# EAGLE board combined (EAGLE 9.6.2)
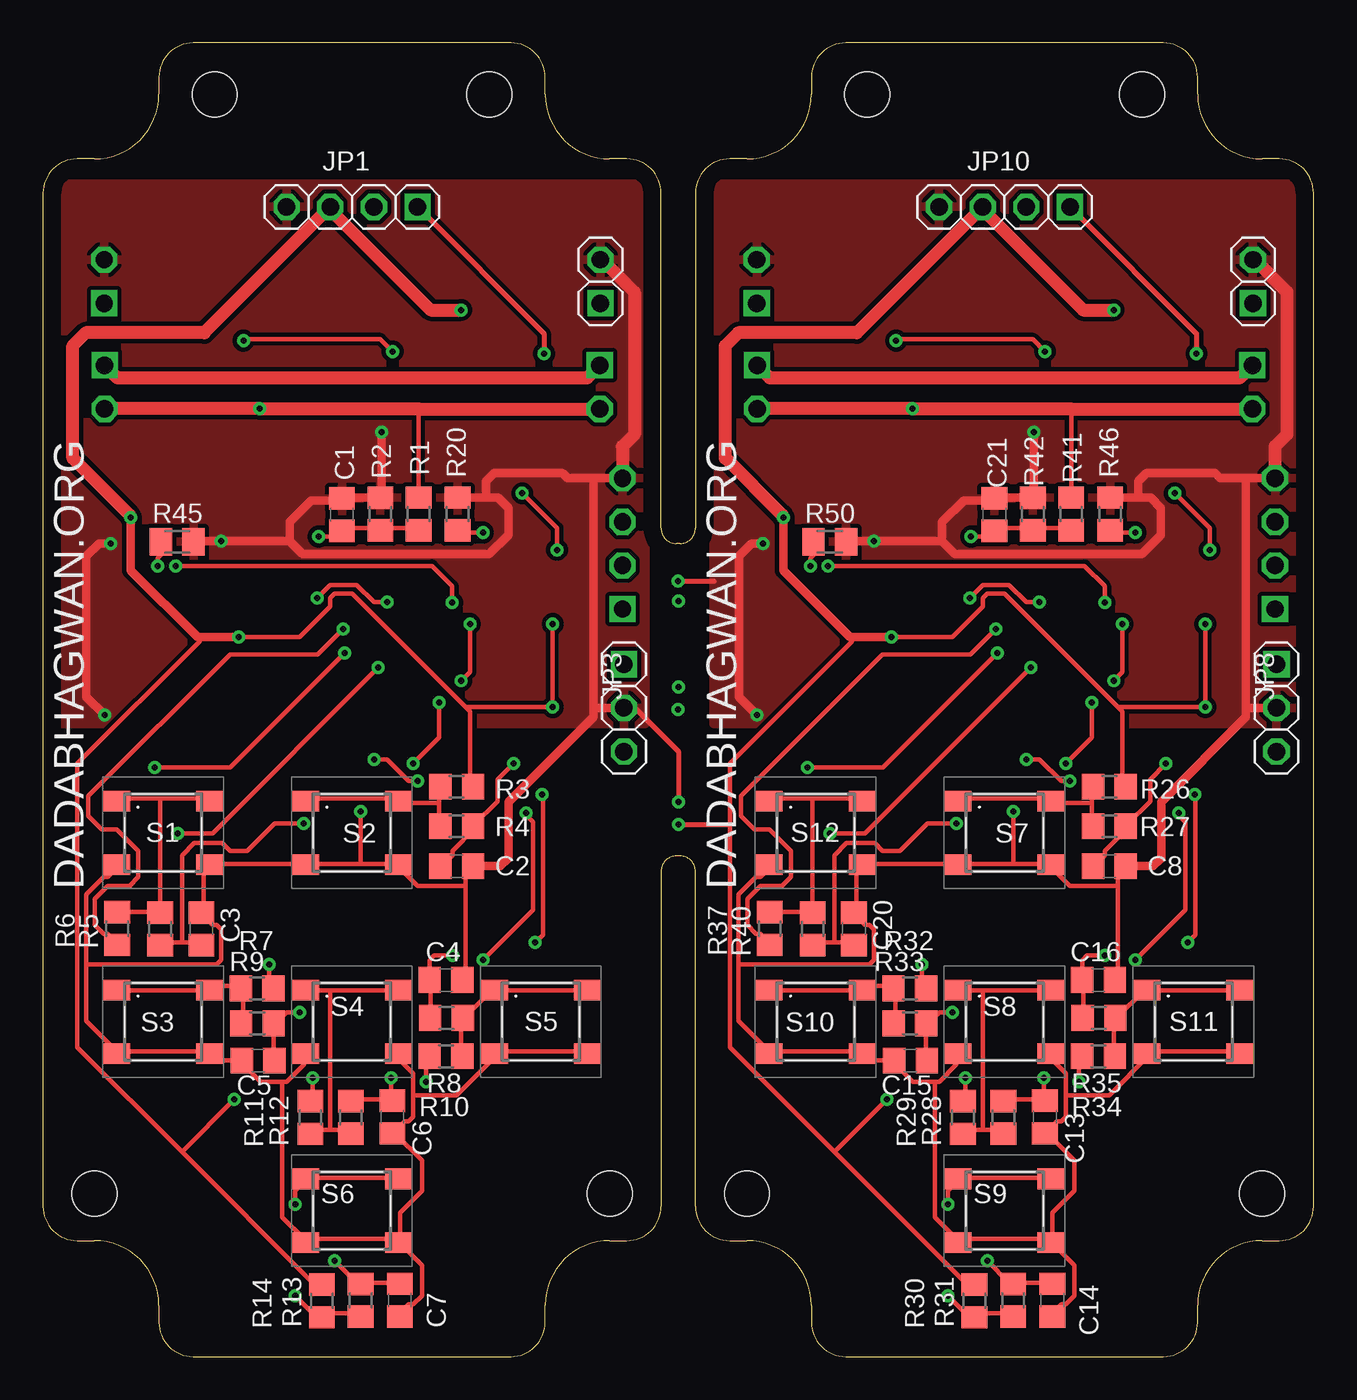
[diagram p0: board, top side]
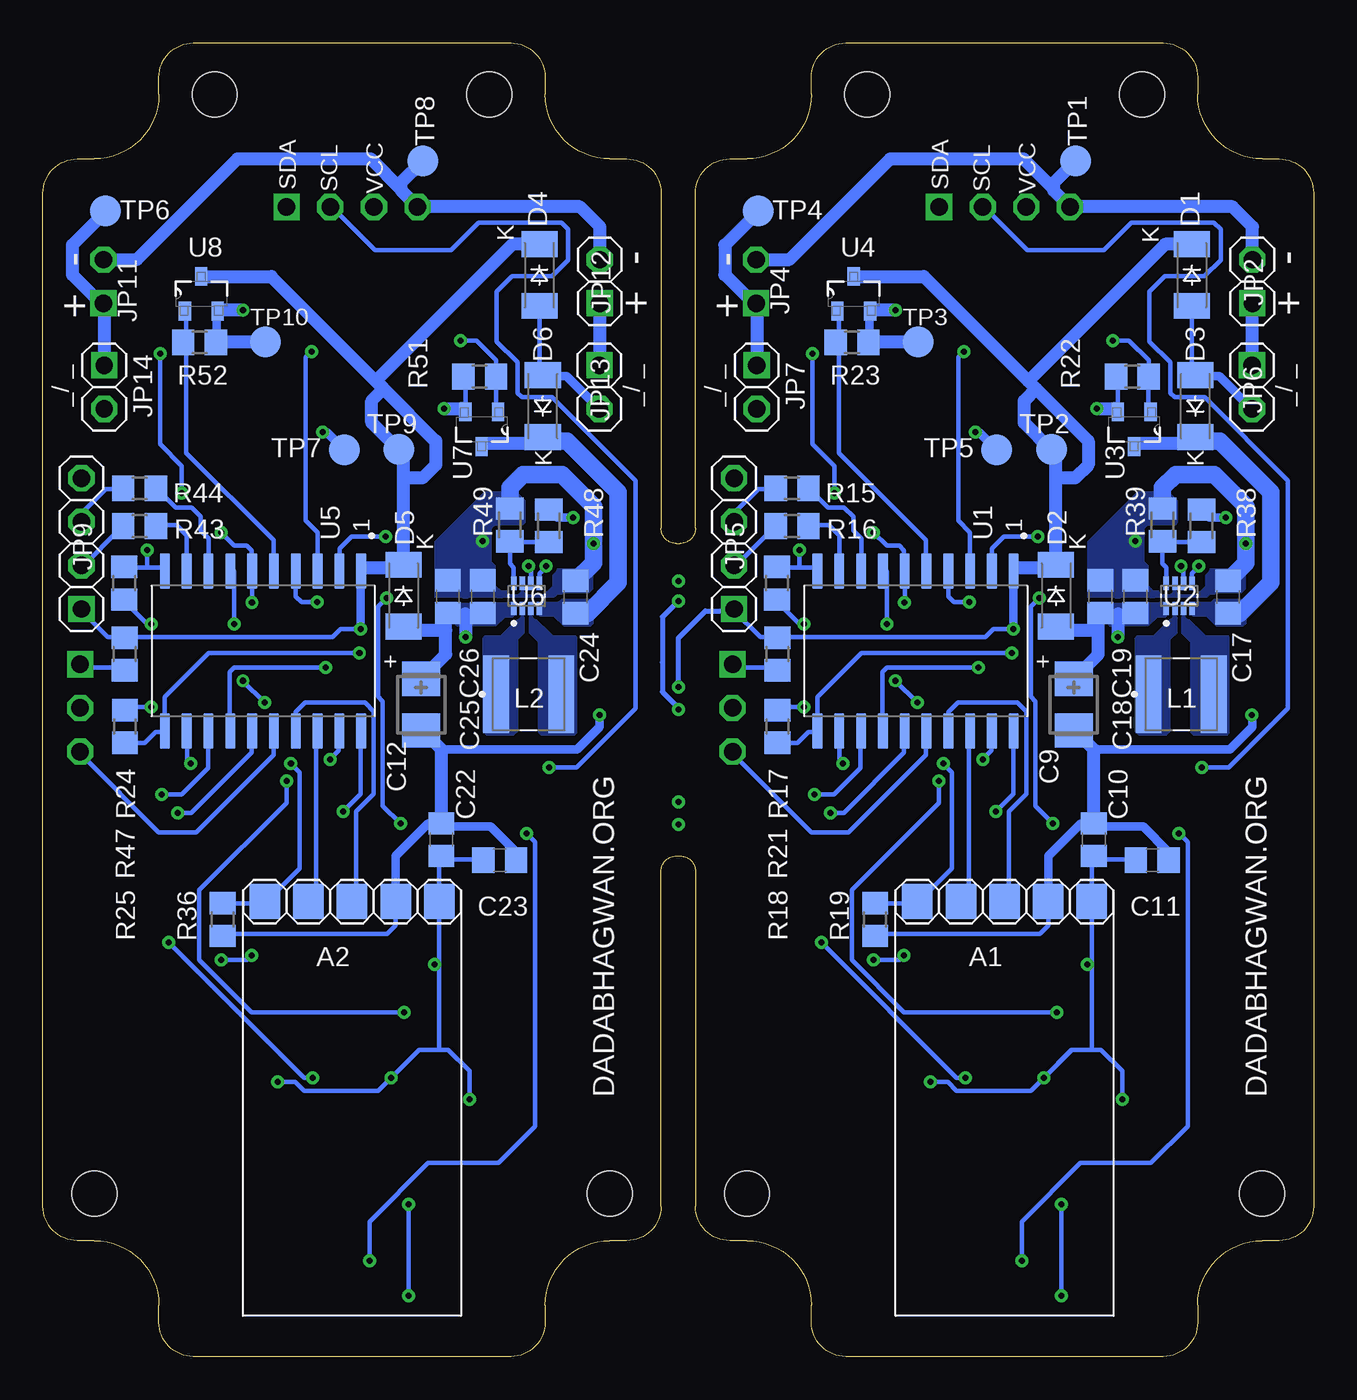
[diagram p1: board, bottom side, seen from below]

Size 74 x 76.5 mm. Coordinates in mm from the lower left corner, seen from the top.
Outline: 37.1,29.15 36.9,29.15 arc90 36,28.25 36,8.75 arc-90 34,6.75 33,6.75 arc90 29.25,3 29.25,2 arc-90 27.25,0 8.75,0 arc-90 6.75,2 6.75,3 arc90 3,6.75 2,6.75 arc-90 0,8.75 0,67.75 arc-90 2,69.75 3,69.75 arc90 6.75,73.5 6.75,74.5 arc-90 8.75,76.5 27.25,76.5 arc-90 29.25,74.5 29.25,73.5 arc90 33,69.75 34,69.75 arc-90 36,67.75 36,48.25 arc90 36.9,47.35 37.1,47.35 arc90 38,48.25 38,67.75 arc-90 40,69.75 41,69.75 arc90 44.75,73.5 44.75,74.5 arc-90 46.75,76.5 65.25,76.5 arc-90 67.25,74.5 67.25,73.5 arc90 71,69.75 72,69.75 arc-90 74,67.75 74,8.75 arc-90 72,6.75 71,6.75 arc90 67.25,3 67.25,2 arc-90 65.25,0 46.75,0 arc-90 44.75,2 44.75,3 arc90 41,6.75 40,6.75 arc-90 38,8.75 38,28.25 arc90 37.1,29.15
Copper layers (1*16): Top 0.035mm / dielectric 1.5mm / Bottom 0.035mm
Design rules "default *": minimum track width 8mil, minimum drill 0.35mm, track to track 8mil, track to pad 8mil, pad to pad 8mil, via to via 8mil, smd to smd 6mil, copper to edge 40mil, drill to drill 6mil, minimum pad ring 10mil, minimum via ring 8mil, stop-mask expansion 4mil, vias tented up to drill 15mil, thermal gap 10mil
Net classes: 0 default: width 0.254 mm, clearance 0.254 mm
Holes 2.6 mm at 3,9.5 33,9.5 41,9.5 71,9.5 10,73.5 26,73.5 48,73.5 64,73.5

## Footprints (pad centres in the part's own frame; a part is rotated, then mirrored left to right if it is on the bottom)
1X05X254 = smd 1.778 x 2.032: 1 -5.08,0; 2 -2.54,0; 3 0,0; 4 2.54,0; 5 5.08,0
C0805 = smd 1.3 x 1.5: 1 -0.95,0; 2 0.95,0
CT3528 = smd 2 x 2.2: + -1.5,0; - 1.5,0
SOD-123_MINI-SMA = smd 1.5 x 2.1: A 1.8,0; C -1.8,0
1X04-S = drill 1.016 square: 1 -3.81,0 | drill 1.016 octagon: 2 -1.27,0; 3 1.27,0; 4 3.81,0
1X02-S = drill 1.016 square: 1 -1.27,0 | drill 1.016 octagon: 2 1.27,0
1X03-S = drill 1.016 square: 1 -2.54,0 | drill 1.016 octagon: 2 0,0; 3 2.54,0
IND_74404043220A = smd 1.5 x 4.5: 1 -1.9,0; 2 1.9,0
R0805 = smd 1.3 x 1.5: 1 -0.95,0; 2 0.95,0
M0805 = smd 1.3 x 1.6: 1 -0.95,0; 2 0.95,0
SW_55MM = smd 1.55 x 1.2: 1 -2.7,1.85; 2 2.7,1.85; 3 -2.7,-1.85; 4 2.7,-1.85
TP18R = smd 1.8 x 1.8: TP 0,0
SOIC127P1032X265-20N = smd 2.05 x 0.6: 1 -4.655,5.715; 2 -4.655,4.445; 3 -4.655,3.175; 4 -4.655,1.905; 5 -4.655,0.635; 6 -4.655,-0.635; 7 -4.655,-1.905; 8 -4.655,-3.175; 9 -4.655,-4.445; 10 -4.655,-5.715; 11 4.655,-5.715; 12 4.655,-4.445; 13 4.655,-3.175; 14 4.655,-1.905; 15 4.655,-0.635; 16 4.655,0.635; 17 4.655,1.905; 18 4.655,3.175; 19 4.655,4.445; 20 4.655,5.715
SOTFL50P160X60-8N = smd 0.768 x 0.32: 1 -0.737,0.75; 2 -0.737,0.25; 3 -0.737,-0.25; 4 -0.737,-0.75; 5 0.737,-0.75; 6 0.737,-0.25; 7 0.737,0.25; 8 0.737,0.75
SOT103P240X110-3N = smd 1.1 x 0.711: 1 -1.016,0.95; 2 -1.016,-0.95; 3 1.016,0

## Placement (x,y rotation side)
A1  1X05  [1X05X254]  18,26.5 180 bottom
A2  1X05  [1X05X254]  56,26.5 180 bottom
C1  100nF  [C0805]  17.41,49.03 90 top
C2  100nF  [C0805]  24.1,28.56 0 top
C3  100nF  [C0805]  9.23,24.9 90 top
C4  100nF  [C0805]  23.47,21.93 0 top
C5  100nF  [C0805]  12.53,17.24 180 top
C6  100nF  [C0805]  20.35,13.95 270 top
C7  100nF  [C0805]  20.78,3.29 270 top
C8  100nF  [C0805]  62.1,28.56 0 top
C9  10uF  [CT3528]  13.97,37.96 270 bottom
C10  10uF  [C0805]  12.8,30.1 90 bottom
C11  10uF  [C0805]  9.4,28.9 0 bottom
C12  10uF  [CT3528]  51.97,37.96 270 bottom
C13  100nF  [C0805]  58.35,13.95 270 top
C14  100nF  [C0805]  58.78,3.29 270 top
C15  100nF  [C0805]  50.53,17.24 180 top
C16  100nF  [C0805]  61.47,21.93 0 top
C17  10uF  [C0805]  4.98,44.23 90 bottom
C18  10uF  [C0805]  10.38,44.25 90 bottom
C19  10uF  [C0805]  12.42,44.25 90 bottom
C20  100nF  [C0805]  47.23,24.9 90 top
C21  100nF  [C0805]  55.41,49.03 90 top
C22  10uF  [C0805]  50.8,30.1 90 bottom
C23  10uF  [C0805]  47.4,28.9 0 bottom
C24  10uF  [C0805]  42.98,44.23 90 bottom
C25  10uF  [C0805]  48.38,44.25 90 bottom
C26  10uF  [C0805]  50.42,44.25 90 bottom
D1  BAT  [SOD-123_MINI-SMA]  7.09,62.98 270 bottom
D2  BAT  [SOD-123_MINI-SMA]  15,44.31 270 bottom
D3  BAT  [SOD-123_MINI-SMA]  6.89,55.35 90 bottom
D4  BAT  [SOD-123_MINI-SMA]  45.09,62.98 270 bottom
D5  BAT  [SOD-123_MINI-SMA]  53,44.31 270 bottom
D6  BAT  [SOD-123_MINI-SMA]  44.89,55.35 90 bottom
JP1  [1X04-S]  18,66.95 180 top
JP2  [1X02-S]  3.57,62.61 90 bottom
JP3  [1X03-S]  33.84,37.77 270 top
JP4  [1X02-S]  32.47,62.61 90 top
JP5  [1X04-S]  33.75,47.34 90 bottom
JP6  [1X02-S]  3.59,56.46 270 bottom
JP7  [1X02-S]  32.43,56.46 270 bottom
JP8  [1X03-S]  71.84,37.77 270 top
JP9  [1X04-S]  71.75,47.34 90 bottom
JP10  [1X04-S]  56,66.95 180 top
JP11  [1X02-S]  70.47,62.61 90 top
JP12  [1X02-S]  41.57,62.61 90 bottom
JP13  [1X02-S]  41.59,56.46 270 bottom
JP14  [1X02-S]  70.43,56.46 270 bottom
L1  1uH  [IND_74404043220A]  7.71,38.57 0 bottom
L2  1uH  [IND_74404043220A]  45.71,38.57 0 bottom
R1  100K  [R0805]  21.88,49.07 90 top
R2  100K  [R0805]  19.65,49.06 90 top
R3  10K  [R0805]  24.1,33.19 0 top
R4  10K  [R0805]  24.1,30.89 180 top
R5  10K  [R0805]  6.83,24.9 90 top
R6  10K  [R0805]  4.32,24.92 270 top
R7  10K  [R0805]  12.48,21.44 0 top
R8  10K  [R0805]  23.5,19.72 0 top
R9  10K  [R0805]  12.49,19.4 180 top
R10  10K  [R0805]  23.47,17.49 180 top
R11  10K  [R0805]  17.93,13.93 270 top
R12  10K  [R0805]  15.58,13.92 90 top
R13  10K  [R0805]  18.5,3.28 270 top
R14  10K  [R0805]  16.25,3.24 90 top
R15  1K  [R0805]  30.37,50.56 0 bottom
R16  1K  [R0805]  30.37,48.36 0 bottom
R17  30K  [R0805]  31.26,45.04 90 bottom
R18  30K  [R0805]  31.22,36.69 270 bottom
R19  30K  [R0805]  25.54,25.45 90 bottom
R20  30K  [R0805]  24.15,49.07 270 top
R21  200E  [R0805]  31.23,40.91 270 bottom
R22  100K  [R0805]  10.56,57.06 180 bottom
R23  100K  [R0805]  26.88,59.06 180 bottom
R24  30K  [R0805]  69.26,45.04 90 bottom
R25  30K  [R0805]  69.22,36.69 270 bottom
R26  10K  [R0805]  62.1,33.19 0 top
R27  10K  [R0805]  62.1,30.89 180 top
R28  10K  [R0805]  53.58,13.92 90 top
R29  10K  [R0805]  55.93,13.93 270 top
R30  10K  [R0805]  54.25,3.24 90 top
R31  10K  [R0805]  56.5,3.28 270 top
R32  10K  [R0805]  50.48,21.44 0 top
R33  10K  [R0805]  50.49,19.4 180 top
R34  10K  [R0805]  61.47,17.49 180 top
R35  10K  [R0805]  61.5,19.72 0 top
R36  30K  [R0805]  63.54,25.45 90 bottom
R37  10K  [R0805]  42.32,24.92 270 top
R38  511K  [M0805]  6.54,48.38 90 bottom
R39  91K  [M0805]  8.81,48.43 270 bottom
R40  10K  [R0805]  44.83,24.9 90 top
R41  100K  [R0805]  59.88,49.07 90 top
R42  100K  [R0805]  57.65,49.06 90 top
R43  1K  [R0805]  68.37,48.36 0 bottom
R44  1K  [R0805]  68.37,50.56 0 bottom
R45  50K  [M0805]  7.82,47.45 180 top
R46  30K  [R0805]  62.15,49.07 270 top
R47  200E  [R0805]  69.23,40.91 270 bottom
R48  511K  [M0805]  44.54,48.38 90 bottom
R49  91K  [M0805]  46.81,48.43 270 bottom
R50  50K  [M0805]  45.82,47.45 180 top
R51  100K  [R0805]  48.56,57.06 180 bottom
R52  100K  [R0805]  64.88,59.06 180 bottom
S1  SW  [SW_55MM]  7,30.5 0 top
S2  SW  [SW_55MM]  18,30.5 0 top
S3  SW  [SW_55MM]  7,19.5 0 top
S4  SW  [SW_55MM]  18,19.5 0 top
S5  SW  [SW_55MM]  29,19.5 0 top
S6  SW  [SW_55MM]  18,8.5 0 top
S7  SW  [SW_55MM]  56,30.5 0 top
S8  SW  [SW_55MM]  56,19.5 0 top
S9  SW  [SW_55MM]  56,8.5 0 top
S10  SW  [SW_55MM]  45,19.5 0 top
S11  SW  [SW_55MM]  67,19.5 0 top
S12  SW  [SW_55MM]  45,30.5 0 top
TP1  GND  [TP18R]  13.87,69.62 0 bottom
TP2  VDD  [TP18R]  15.26,52.82 270 bottom
TP3  VCC  [TP18R]  23.04,59.08 0 bottom
TP4  VBAT  [TP18R]  32.35,66.73 180 bottom
TP5  GND  [TP18R]  18.45,52.79 0 bottom
TP6  VBAT  [TP18R]  70.35,66.73 180 bottom
TP7  GND  [TP18R]  56.45,52.79 0 bottom
TP8  GND  [TP18R]  51.87,69.62 0 bottom
TP9  VDD  [TP18R]  53.26,52.82 270 bottom
TP10  VCC  [TP18R]  61.04,59.08 0 bottom
U1  1  [SOIC127P1032X265-20N]  23.18,41.09 270 bottom
U2  TPS  [SOTFL50P160X60-8N]  7.83,44.3 90 bottom
U3  PMOS  [SOT103P240X110-3N]  10.45,54 270 bottom
U4  PMOS  [SOT103P240X110-3N]  26.78,61.89 90 bottom
U5  1  [SOIC127P1032X265-20N]  61.18,41.09 270 bottom
U6  TPS  [SOTFL50P160X60-8N]  45.83,44.3 90 bottom
U7  PMOS  [SOT103P240X110-3N]  48.45,54 270 bottom
U8  PMOS  [SOT103P240X110-3N]  64.78,61.89 90 bottom

## Library data of the parts
A1 A2 = pinhead_smd
C1-C26 = rcl; SPICEPREFIX: C
D1-D6 = diode
JP1-JP14 = pinhead-2
L1 L2 = 5040_INDUCTOR; AVAILABILITY: In Stock; CHECK_PRICES: https://www.snapeda.com/parts/74404043220A/Wurth+Electronics+Inc./view-part/?ref=eda; DESCRIPTION: 22 µH Semi-Shielded Wirewound Inductor 1.11 A 200mOhm Nonstandard; MF: Wurth Electronics; MP: 74404043220A; PACKAGE: Nonstandard Würth Elektronik; PRICE: None; PURCHASE-URL: https://www.snapeda.com/api/url_track_click_mouser/?unipart_id=703901&manufacturer=Wurth Electronics&part_name=74404043220A&search_term=744040; SNAPEDA_LINK: https://www.snapeda.com/parts/74404043220A/Wurth+Electronics+Inc./view-part/?ref=snap
R1-R52 = rcl; SPICEPREFIX: R
S1-S12 = switch_5p5mm; AVAILABILITY: In Stock; CHECK_PRICES: https://www.snapeda.com/parts/PTS%20647%20SK38%20SMTR2%20LFS/C%2526K/view-part/?ref=eda; DESCRIPTION: Tactile Switch SPST-NO Top Actuated Surface Mount; MF: C&K; MP: PTS 647 SK38 SMTR2 LFS; PACKAGE: None; PRICE: None; PURCHASE-URL: https://www.snapeda.com/api/url_track_click_mouser/?unipart_id=4834952&manufacturer=C&amp;K&part_name=PTS 647 SK38 SMTR2 LFS&search_term=pts647; SNAPEDA_LINK: https://www.snapeda.com/parts/PTS%20647%20SK38%20SMTR2%20LFS/C%2526K/view-part/?ref=snap
TP1-TP10 = testpad
U1 U5 = ATTINY1616-SNR; AVAILABILITY: In Stock; DESCRIPTION: AVR tinyAVR™ 1, Functional Safety (FuSa) Microcontroller IC 8-Bit 20MHz 16KB (16K x 8) FLASH 20-SOIC; MF: Microchip Technology; MP: ATTINY1616-SNR; PACKAGE: SOIC-20 Microchip; PRICE: None; PURCHASE-URL: https://pricing.snapeda.com/search/part/ATTINY1616-SNR/?ref=eda
U2 U6 = TPS63000DRLR; AVAILABILITY: In Stock; CHECK_PRICES: https://www.snapeda.com/parts/TPS563212DRLR/Texas+Instruments/view-part/?ref=eda; DESCRIPTION: 4.2-V to 18-V, 3-A, 1.2-MHz, synchronous buck converter with eco-mode and selectable FCCM; MF: Texas Instruments; MP: TPS563212DRLR; PACKAGE: SOT-583 Texas Instruments; PRICE: None; PURCHASE-URL: https://www.snapeda.com/api/url_track_click_mouser/?unipart_id=9593796&manufacturer=Texas Instruments&part_name=TPS563212DRLR&search_term=sot-583; SNAPEDA_LINK: https://www.snapeda.com/parts/TPS563212DRLR/Texas+Instruments/view-part/?ref=snap
U3 U4 U7 U8 = DMP3165L; AVAILABILITY: In Stock; CHECK_PRICES: https://www.snapeda.com/parts/DMP3130L-7/Diodes+Inc./view-part/?ref=eda; DESCRIPTION: P-Channel 30 V 3.5A (Ta) 700mW (Ta) Surface Mount SOT-23-3; MF: Diodes Inc.; MP: DMP3130L-7; PACKAGE: SOT-23 Diodes Inc.; PRICE: None; PURCHASE-URL: https://pricing.snapeda.com/search?q=DMP3130L-7&ref=eda; SNAPEDA_LINK: https://www.snapeda.com/parts/DMP3130L-7/Diodes+Inc./view-part/?ref=snap

## Nets
DC_SW: R22.1 U1.3 U3.1
DC_SW1: R51.1 U5.3 U7.1
GND: A1.2 C1.2 C2.2 C3.2 C4.2 C5.2 C6.2 C7.2 C9.- C10.2 C11.2 C17.2 C18.2 C19.2 JP1.4 JP2.2 JP3.2 JP4.2 JP5.4 R2.2 R19.1 R20.1 R39.1 R45.1 S1.3 S1.4 S2.3 S2.4 S3.3 S3.4 S4.3 S4.4 S5.3 S5.4 S6.3 S6.4 TP1.TP TP5.TP U1.20 U2.7
GND1: A2.2 C8.2 C12.- C13.2 C14.2 C15.2 C16.2 C20.2 C21.2 C22.2 C23.2 C24.2 C25.2 C26.2 JP8.2 JP9.4 JP10.4 JP11.2 JP12.2 R36.1 R42.2 R46.1 R49.1 R50.1 S7.3 S7.4 S8.3 S8.4 S9.3 S9.4 S10.3 S10.4 S11.3 S11.4 S12.3 S12.4 TP7.TP TP8.TP U5.20 U6.7
LX1: L1.2 U2.3
LX2: L1.1 U2.2
LX3: L2.2 U6.3
LX4: L2.1 U6.2
N$1: R5.2 R6.1 S1.1 S1.2
N$2: JP3.3 U1.16
N$3: JP3.1 R21.2
N$4: R26.1 R27.2 S7.1 S7.2
N$5: R11.2 R12.1 S4.1 S4.2
N$6: R28.1 R29.2 S8.1 S8.2
N$7: R30.1 R31.2 S9.1 S9.2
N$8: R13.2 R14.1 S6.1 S6.2
N$9: R7.1 R9.2 S3.1 S3.2
N$10: R8.2 R10.1 S5.1 S5.2
N$11: R32.1 R33.2 S10.1 S10.2
N$12: R3.1 R4.2 S2.1 S2.2
N$13: R34.1 R35.2 S11.1 S11.2
N$14: R37.1 R40.2 S12.1 S12.2
N$15: JP8.3 U5.16
N$16: JP8.1 R47.2
N$17: R48.1 R49.2 U6.8
N$18: R50.2 U6.5
N$27: R38.1 R39.2 U2.8
N$36: R45.2 U2.5
RXD0: R15.2 U1.8
RXD00: JP5.3 R15.1
RXD1: A1.4 U1.18
RXD02: R44.2 U5.8
RXD03: A2.4 U5.18
RXD04: JP9.3 R44.1
S1: C2.1 R4.1 U1.12
S2: C6.1 R11.1 U1.13
S3: C7.1 R13.1 U1.14
S4: C5.1 R9.1 U1.19
S5: C4.1 R8.1 U1.15
S6: C3.1 R5.1 U1.4
S7: C8.1 R27.1 U5.12
S8: C13.1 R29.1 U5.13
S9: C14.1 R31.1 U5.14
S10: C15.1 R33.1 U5.19
S11: C16.1 R35.1 U5.15
S12: C20.1 R40.1 U5.4
SCL: JP1.2 R18.2 U1.11
SCL1: JP10.2 R25.2 U5.11
SDA: JP1.1 R17.2 U1.10
SDA1: JP10.1 R24.2 U5.10
SET: A1.5 R19.2 U1.7
SET1: A2.5 R36.2 U5.7
SHDN: R20.2 U1.6 U2.6
SHDN1: R46.2 U5.6 U6.6
TXD0: R16.2 U1.9
TXD00: JP5.2 R16.1
TXD1: A1.3 U1.17
TXD02: R43.2 U5.9
TXD03: A2.3 U5.17
TXD04: JP9.2 R43.1
VADC: C1.1 R1.1 R2.1 U1.2
VADC1: C21.1 R41.1 R42.1 U5.2
VBAT: JP2.1 JP4.1 JP6.1 JP7.1 TP4.TP
VBAT1: JP11.1 JP12.1 JP13.1 JP14.1 TP6.TP
VBAT_O: D1.A D3.A JP6.2 JP7.2 R1.2 R22.2 U3.2
VBAT_O1: D4.A D6.A JP13.2 JP14.2 R41.2 R51.2 U7.2
VCC: A1.1 C9.+ C10.1 C11.1 C18.1 C19.1 D2.A JP1.3 R3.2 R7.2 R10.2 R12.2 R14.2 R17.1 R18.1 R23.1 R38.2 TP3.TP U2.1 U4.2
VCC1: A2.1 C12.+ C22.1 C23.1 C25.1 C26.1 D5.A JP10.3 R24.1 R25.1 R26.2 R28.2 R30.2 R32.2 R34.2 R48.2 R52.1 TP10.TP U6.1 U8.2
VCC_SW: R23.2 U1.5 U4.1
VCC_SW1: R52.2 U5.5 U8.1
VDD: D1.C D2.C JP5.1 R6.2 R21.1 TP2.TP U1.1 U4.3
VDD1: D4.C D5.C JP9.1 R37.2 R47.1 TP9.TP U5.1 U8.3
VIN: C17.1 D3.C U2.4 U3.3
VIN1: C24.1 D6.C U6.4 U7.3

## Tracks (layer width: path | path; a pad name or v marks a point on that pad's centre or on a via)
DC_SW  (via drill 0.35)
  Top 0.254: v20.36,58.53 19.65,59.24 11.76,59.24 v11.68,59.16
  Bottom 0.254: U3.1 9.62,55.1 9.62,56.88 R22.1 9.61,58.02 10.75,59.16 v11.68,59.16 | v20.36,58.53 20.7,58.19 20.7,48.69 20,47.99 U1.3
DC_SW1  (via drill 0.35)
  Top 0.254: v58.36,58.53 57.65,59.24 49.76,59.24 v49.68,59.16
  Bottom 0.254: U7.1 47.62,55.1 47.62,56.88 R51.1 47.61,58.02 48.75,59.16 v49.68,59.16 | v58.36,58.53 58.7,58.19 58.7,48.69 58.01,47.99 U5.3
GND  (via drill 0.35)
  Top 0.254: 24.61,27.42 24.61,28.18 24.86,28.43 C2.2 | 24.61,27.42 24.61,22.08 C4.2 | 18.51,28.69 20.54,28.69 S2.4 20.8,28.43 21.81,27.42 24.61,27.42 | 18.51,28.69 15.46,28.69 S2.3 15.21,28.69 9.88,28.69 S1.4 9.62,28.43 9.37,28.18 9.37,25.89 C3.2 9.37,25.64 9.88,25.13 10.13,25.13 10.38,24.88 10.38,23.1 10.13,22.85 2.51,22.85 | 18.51,28.69 v18.51,31.74 | 13.94,15.99 12.67,15.99 11.65,17 C5.2 11.4,17.26 10.13,17.26 9.88,17.51 S3.4 9.62,17.77 4.54,17.77 S3.3 4.29,17.77 2.51,19.54 2.51,22.85 | 13.94,15.99 14.19,15.99 15.21,17 15.21,17.51 S4.3 | 2.51,22.85 2.51,26.91 3.53,27.93 3.78,27.93 4.29,28.43 S1.3 | C7.2 20.8,2.53 21.31,3.03 21.56,3.03 22.07,3.54 22.07,5.32 20.8,6.59 S6.4 | S6.4 20.54,6.84 15.46,6.84 S6.3 15.21,6.84 13.94,8.11 13.94,15.99 | 21.56,15.23 21.56,16.5 20.54,17.51 S4.4 | 21.56,15.23 21.56,13.96 21.31,13.7 21.05,13.7 C6.2 20.54,12.94 22.07,11.42 22.07,9.64 20.8,8.37 20.8,6.84 S6.4 | S5.4 31.47,17.77 26.39,17.77 S5.3 26.39,17.51 24.1,15.23 21.56,15.23 | R2.2 19.53,50.02 17.5,50.02 C1.2 17.24,49.77 | 24.35,50.02 R20.1
  Top 0.305: JP3.2 34.47,37.77 37,35.24 v37,32.29
  Top 0.508: v3.94,47.35 3.27,47.35 2.53,46.61 2.53,38.42 v3.59,37.36 | v19.71,53.83 19.71,50.21 19.53,50.02 | R45.1 8.8,47.48 v10.38,47.48 14.36,47.48 | 25.8,50.02 26.51,50.02 27.11,49.42 27.11,47.85 25.99,46.73 15.11,46.73 14.36,47.48 | 25.8,50.02 24.35,50.02 | R2.2 17.48,50.01 17.24,49.77 | C1.2 17.28,49.85 15.62,49.85 14.36,48.59 14.36,47.48 | C2.2 26.66,28.56 27.12,29.02 27.12,32.3 32.06,37.24 32.06,37.9 | 33.74,51.16 | 25.8,50.02 25.8,50.98 26.27,51.45 30.26,51.45 30.55,51.16 32.06,51.16 | 32.06,51.16 33.74,51.16 | 32.06,51.16 32.06,37.9 | JP3.2 32.19,37.77 32.06,37.9
  Top 0.762: JP4.2 32.56,63.88 34.44,62 34.44,53.69 33.74,53 33.74,51.16 JP5.4
  Bottom 0.254: v18.51,31.74 17.5,32.75 17.5,36.31 U1.20 | R19.1 25.37,24.62 15.94,24.62 15.46,25.11 A1.2 | 13.95,36.37 C9.-
  Bottom 0.508: v3.59,37.36 3.57,37.34 3.57,36.66 4.88,35.35 12.79,35.35 | A1.2 15.46,29.16 13.57,31.05 C10.2 12.61,30.86 9.92,30.86 8.45,29.39 C11.2 | TP5.TP 19.49,53.83 v19.71,53.83
  Bottom 0.762: JP2.2 3.57,65.79 4.73,66.95 JP1.4 15.14,67.91 15.14,67.99 | C10.2 12.79,35.35 13.81,36.37 13.95,36.37 | JP4.2 30.53,63.88 24.66,69.75 16.9,69.75 15.14,67.99 | 15.14,67.99 15.14,68.35 TP1.TP
  Bottom 1.016: C17.2 3.94,46.22 v3.94,47.35 3.94,49.53 5.78,51.37 8.04,51.37 8.81,50.6 R39.1
  pour Bottom (isolate 0.2, rank 2, no thermals): 8.39,44.57 8.27,44.67 8.27,45.37 7.88,45.37 7.88,44.71 7.69,44.52 6.61,44.52 6.28,44.85 6.28,45.59 6.02,45.85 4.12,45.85 3.99,45.72 3.99,44.58 4.09,44.48 5.7,44.48 6.07,44.11 13.04,44.11 13.15,44.22 13.15,47.43 10.24,50.34 8.45,50.34 7.93,49.82 7.93,48.59 8.06,48.46 9.43,48.46 9.89,48 9.89,46.27 9.66,46.04 9.66,44.88 9.35,44.57
  pour Top (isolate 0.254): 1.04,68.31 1.04,36.84 35.1,36.84 35.1,68.31
GND1  (via drill 0.35)
  Top 0.254: 62.61,27.42 62.61,28.18 62.86,28.43 C8.2 | 62.61,27.42 62.61,22.08 C16.2 | 56.51,28.69 58.54,28.69 S7.4 58.8,28.43 59.81,27.42 62.61,27.42 | 56.51,28.69 53.46,28.69 S7.3 53.21,28.69 47.88,28.69 S12.4 47.62,28.43 47.37,28.18 47.37,25.89 C20.2 47.37,25.64 47.88,25.13 48.13,25.13 48.38,24.88 48.38,23.1 48.13,22.85 40.51,22.85 | 56.51,28.69 v56.51,31.74 | 51.94,15.99 50.67,15.99 49.65,17 C15.2 49.4,17.26 48.13,17.26 47.88,17.51 S10.4 47.62,17.77 42.54,17.77 S10.3 42.29,17.77 40.51,19.54 40.51,22.85 | 51.94,15.99 52.19,15.99 53.21,17 53.21,17.51 S8.3 | 40.51,22.85 40.51,26.91 41.53,27.93 41.78,27.93 42.29,28.43 S12.3 | C14.2 58.8,2.53 59.31,3.03 59.56,3.03 60.07,3.54 60.07,5.32 58.8,6.59 S9.4 | S9.4 58.54,6.84 53.46,6.84 S9.3 53.21,6.84 51.94,8.11 51.94,15.99 | 59.56,15.23 59.56,16.5 58.54,17.51 S8.4 | 59.56,15.23 59.56,13.96 59.31,13.7 59.05,13.7 C13.2 58.54,12.94 60.07,11.42 60.07,9.64 58.8,8.37 58.8,6.84 S9.4 | S11.4 69.47,17.77 64.39,17.77 S11.3 64.39,17.51 62.1,15.23 59.56,15.23 | R42.2 57.53,50.02 55.5,50.02 C21.2 55.24,49.77 | 62.35,50.02 R46.1
  Top 0.305: v36.99,45.16 39.1,45.16
  Top 0.508: v41.94,47.35 41.27,47.35 40.53,46.61 40.53,38.42 v41.59,37.36 | v57.71,53.83 57.71,50.21 57.53,50.02 | R50.1 46.8,47.48 v48.38,47.48 52.36,47.48 | 63.8,50.02 64.51,50.02 65.11,49.42 65.11,47.85 63.99,46.73 53.11,46.73 52.36,47.48 | 63.8,50.02 62.35,50.02 | R42.2 55.48,50.01 55.24,49.77 | C21.2 55.28,49.85 53.62,49.85 52.36,48.59 52.36,47.48 | C8.2 64.66,28.56 65.12,29.02 65.12,32.3 70.06,37.24 70.06,37.9 | 71.74,51.16 | 63.8,50.02 63.8,50.98 64.27,51.45 68.26,51.45 68.55,51.16 70.06,51.16 | 70.06,51.16 71.74,51.16 | 70.06,51.16 70.06,37.9 | JP8.2 70.19,37.77 70.06,37.9
  Top 0.762: JP11.2 70.56,63.88 72.44,62 72.44,53.69 71.74,53 71.74,51.16 JP9.4
  Bottom 0.254: v56.51,31.74 55.5,32.75 55.5,36.31 U5.20 | R36.1 63.37,24.62 53.94,24.62 53.46,25.11 A2.2 | 51.95,36.37 C12.-
  Bottom 0.508: v41.59,37.36 41.57,37.34 41.57,36.66 42.88,35.35 50.79,35.35 | A2.2 53.46,29.16 51.57,31.05 C22.2 50.61,30.86 47.92,30.86 46.45,29.39 C23.2 | TP7.TP 57.49,53.83 v57.71,53.83
  Bottom 0.762: JP12.2 41.57,65.79 42.73,66.95 JP10.4 53.14,67.91 53.14,67.99 | C22.2 50.79,35.35 51.81,36.37 51.95,36.37 | JP11.2 68.53,63.88 62.66,69.75 54.9,69.75 53.14,67.99 | 53.14,67.99 53.14,68.35 TP8.TP
  Bottom 1.016: C24.2 41.94,46.22 v41.94,47.35 41.94,49.53 43.78,51.37 46.04,51.37 46.81,50.6 R49.1
  pour Bottom (isolate 0.2, rank 2, no thermals): 46.39,44.57 46.27,44.67 46.27,45.37 45.88,45.37 45.88,44.71 45.69,44.52 44.61,44.52 44.28,44.85 44.28,45.59 44.02,45.85 42.12,45.85 41.99,45.72 41.99,44.58 42.09,44.48 43.7,44.48 44.07,44.11 51.04,44.11 51.15,44.22 51.15,47.43 48.24,50.34 46.45,50.34 45.93,49.82 45.93,48.59 46.06,48.46 47.43,48.46 47.89,48 47.89,46.27 47.66,46.04 47.66,44.88 47.35,44.57
  pour Top (isolate 0.254): 39.04,68.31 39.04,36.84 73.1,36.84 73.1,68.31
LX1
  pour Bottom (isolate 0.1, no thermals): 7.49,43.89 7.67,43.89 7.67,42.17 7.14,41.64 7.14,36.36 6.97,36.19 5.07,36.19 4.93,36.33 4.93,41.88 5,41.95 6.32,41.95 7.48,43.11 7.48,43.88
LX2
  pour Bottom (no thermals): 8.14,43.13 8.14,43.9 7.98,43.9 7.98,42.17 8.37,41.78 8.37,36.44 8.61,36.2 10.14,36.2 10.38,36.44 10.38,41.83 10.26,41.95 9.32,41.95
LX3
  pour Bottom (isolate 0.1, no thermals): 45.49,43.89 45.67,43.89 45.67,42.17 45.14,41.64 45.14,36.36 44.97,36.19 43.07,36.19 42.93,36.33 42.93,41.88 43,41.95 44.32,41.95 45.48,43.11 45.48,43.88
LX4
  pour Bottom (no thermals): 46.14,43.13 46.14,43.9 45.98,43.9 45.98,42.17 46.37,41.78 46.37,36.44 46.61,36.2 48.14,36.2 48.38,36.44 48.38,41.83 48.26,41.95 47.32,41.95
N$1
  Top 0.254: 6.83,25.89 4.54,25.89 R6.1 | 6.83,32.5 9.62,32.5 S1.2 | 6.83,32.5 4.54,32.5 S1.1 | 6.83,32.5 6.83,25.89 | 6.83,25.89 R5.2
N$2
  Bottom 0.254: U1.16 22.58,36.31 22.58,35.04 27.08,30.53 29.25,30.53 33.75,35.04 JP3.3
N$3
  Bottom 0.254: R21.2 31.47,40.12 33.75,40.12 JP3.1
N$4
  Top 0.254: 61.08,32.24 61.08,33.01 R26.1 | 61.08,32.24 61.08,30.97 R27.2 | S7.1 53.46,32.5 58.54,32.5 S7.2 58.8,32.24 61.08,32.24
N$5
  Top 0.254: 16.73,13.19 17.75,13.19 R11.2 | 16.73,13.19 15.72,13.19 R12.1 | 16.73,21.32 20.54,21.32 S4.2 | 16.73,21.32 15.46,21.32 S4.1 | 16.73,21.32 16.73,13.19
N$6
  Top 0.254: 54.73,13.19 55.75,13.19 R29.2 | 54.73,13.19 53.72,13.19 R28.1 | 54.73,21.32 58.54,21.32 S8.2 | 54.73,21.32 53.46,21.32 S8.1 | 54.73,21.32 54.73,13.19
N$7  (via drill 0.35)
  Top 0.254: R31.2 56.26,2.53 54.48,2.53 R30.1 54.23,2.53 53.72,2.53 v52.7,3.54 | S9.2 58.54,10.4 53.46,10.4 S9.1 53.21,10.15 52.7,9.64 v52.7,8.88
  Bottom 0.254: v52.7,8.88 v52.7,3.54
N$8  (via drill 0.35)
  Top 0.254: R13.2 18.26,2.53 16.48,2.53 R14.1 16.23,2.53 15.72,2.53 v14.7,3.54 | S6.2 20.54,10.4 15.46,10.4 S6.1 15.21,10.15 14.7,9.64 v14.7,8.88
  Bottom 0.254: v14.7,8.88 v14.7,3.54
N$9
  Top 0.254: R9.2 11.65,19.54 11.65,21.32 R7.1 11.4,21.58 9.88,21.58 S3.2 9.62,21.32 4.54,21.32 S3.1
N$10
  Top 0.254: R10.1 24.35,17.51 24.35,19.54 R8.2 24.61,19.8 26.13,21.32 S5.1 26.39,21.32 31.47,21.32 S5.2
N$11
  Top 0.254: R33.2 49.65,19.54 49.65,21.32 R32.1 49.4,21.58 47.88,21.58 S10.2 47.62,21.32 42.54,21.32 S10.1
N$12
  Top 0.254: 23.08,32.24 23.08,33.01 R3.1 | 23.08,32.24 23.08,30.97 R4.2 | S2.1 15.46,32.5 20.54,32.5 S2.2 20.8,32.24 23.08,32.24
N$13
  Top 0.254: R34.1 62.35,17.51 62.35,19.54 R35.2 62.61,19.8 64.13,21.32 S11.1 64.39,21.32 69.47,21.32 S11.2
N$14
  Top 0.254: 44.83,25.89 42.54,25.89 R37.1 | 44.83,32.5 47.62,32.5 S12.2 | 44.83,32.5 42.54,32.5 S12.1 | 44.83,32.5 44.83,25.89 | 44.83,25.89 R40.2
N$15
  Bottom 0.254: U5.16 60.58,36.31 60.58,35.04 65.08,30.53 67.25,30.53 71.75,35.04 JP8.3
N$16
  Bottom 0.254: R47.2 69.47,40.12 71.75,40.12 JP8.1
N$17
  Bottom 0.254: R48.1 46.76,47.43 R49.2 46.81,46.18 46.58,45.95 U6.8
N$18  (via drill 0.35)
  Top 0.254: v44.69,46.05 44.69,46.51 45.03,46.86 45.08,46.98 45.08,47.23 R50.2
  Bottom 0.254: v44.69,46.05 44.69,45.99 45.08,45.6 U6.5
N$27
  Bottom 0.254: R38.1 8.76,47.43 R39.2 8.81,46.18 8.58,45.95 U2.8
N$36  (via drill 0.35)
  Top 0.254: v6.69,46.05 6.69,46.51 7.03,46.86 7.08,46.98 7.08,47.23 R45.2
  Bottom 0.254: v6.69,46.05 6.69,45.99 7.08,45.6 U2.5
RXD0
  Bottom 0.254: U1.8 26.34,45.75 26.34,47.64 26.81,48.11 26.81,48.91 27.34,49.44 28.28,49.44 29.41,50.56 R15.2
RXD00
  Bottom 0.254: R15.1 31.47,50.53 32.34,50.53 33.75,49.13 JP5.3
RXD1
  Bottom 0.254: A1.4 20.09,26.78 20.09,36.25 20.04,36.31 U1.18
RXD02
  Bottom 0.254: U5.8 64.34,45.75 64.34,47.64 64.81,48.11 64.81,48.91 65.34,49.44 66.28,49.44 67.41,50.56 R44.2
RXD03
  Bottom 0.254: A2.4 58.09,26.78 58.09,36.25 58.04,36.31 U5.18
RXD04
  Bottom 0.254: R44.1 69.47,50.53 70.34,50.53 71.75,49.13 JP9.3
S1  (via drill 0.35)
  Top 0.254: C2.1 23.34,28.69 23.85,29.2 23.85,29.45 25.12,30.72 R4.1 25.12,30.97 26.48,32.34 26.48,33.61 v27.4,34.53
  Bottom 0.254: v27.4,34.53 27.61,34.74 27.61,36.43 U1.12
S2  (via drill 0.35)
  Top 0.254: 20.29,14.97 18,14.97 R11.1 | v28.67,24.12 29.11,24.56 29.11,32.7 v29.07,32.74 | 20.29,14.97 v20.29,16.24 | 20.29,14.97 C6.1
  Bottom 0.254: v29.07,32.74 27.92,32.74 26.39,34.28 26.39,36.31 U1.13 | v28.67,24.12 20.8,16.24 v20.29,16.24
S3  (via drill 0.35)
  Top 0.254: C7.1 20.54,4.3 18.51,4.3 R13.1 18.26,4.3 v16.99,5.57 | v19.53,40.12 9.88,30.47 v7.84,30.47
  Bottom 0.254: v19.53,40.12 24.86,40.12 25.12,39.86 25.12,36.56 U1.14 | v7.84,30.47 7.34,29.96 7.34,13.4 9.47,11.27 13.58,11.27 16.99,7.86 v16.99,5.57
S4  (via drill 0.35)
  Top 0.254: C5.1 13.43,17.26 13.43,19.29 R9.1 13.69,19.54 14.19,20.05 v14.96,20.05 | v19.27,34.78 20.04,34.78 21.31,33.51 v21.81,33.51
  Bottom 0.254: v19.27,34.78 18.77,35.29 18.77,36.31 U1.19 | v21.81,33.51 21.81,32.24 26.89,27.16 26.89,23.1 23.85,20.05 v14.96,20.05
S5  (via drill 0.35)
  Top 0.254: R8.1 22.58,19.8 22.58,21.83 C4.1 22.52,23.08 22.79,23.35 v23.85,23.35 | v28.14,31.66 28.14,31.53 28.54,31.13 28.54,26.02 v25.62,23.1
  Bottom 0.254: v28.14,31.66 27.36,31.66 23.85,35.17 23.85,36.31 U1.15 | v25.62,23.1 24.1,23.1 v23.85,23.35
S6  (via drill 0.35)
  Top 0.254: 8.1,24.12 9.11,24.12 C3.1 | 8.1,24.12 7.08,24.12 R5.1 | v20.04,43.93 19.27,43.93 18.26,44.94 16.73,44.94 v15.97,44.18 | v15.18,31.04 13.5,31.04 11.91,29.45 10.89,29.45 10.44,29.9 8.81,29.9 8.1,29.2 8.1,24.12
  Bottom 0.254: v20.04,43.93 20.94,43.93 21.27,44.26 U1.4 | v15.97,44.18 16.48,43.67 16.48,38.43 16.2,38.15 16.2,32.06 v15.18,31.04
S7  (via drill 0.35)
  Top 0.254: C8.1 61.34,28.69 61.85,29.2 61.85,29.45 63.12,30.72 R27.1 63.12,30.97 64.48,32.34 64.48,33.61 v65.4,34.53
  Bottom 0.254: v65.4,34.53 65.61,34.74 65.61,36.43 U5.12
S8  (via drill 0.35)
  Top 0.254: 58.29,14.97 56,14.97 R29.1 | v66.67,24.12 67.11,24.56 67.11,32.7 v67.07,32.74 | 58.29,14.97 v58.29,16.24 | 58.29,14.97 C13.1
  Bottom 0.254: v67.07,32.74 65.92,32.74 64.39,34.28 64.39,36.31 U5.13 | v66.67,24.12 58.8,16.24 v58.29,16.24
S9  (via drill 0.35)
  Top 0.254: C14.1 58.54,4.3 56.51,4.3 R31.1 56.26,4.3 v54.99,5.57 | v57.53,40.12 47.88,30.47 v45.84,30.47
  Bottom 0.254: v57.53,40.12 62.86,40.12 63.12,39.86 63.12,36.56 U5.14 | v45.84,30.47 45.34,29.96 45.34,13.4 47.47,11.27 51.58,11.27 54.99,7.86 v54.99,5.57
S10  (via drill 0.35)
  Top 0.254: C15.1 51.43,17.26 51.43,19.29 R33.1 51.69,19.54 52.19,20.05 v52.96,20.05 | v57.27,34.78 58.04,34.78 59.31,33.51 v59.81,33.51
  Bottom 0.254: v57.27,34.78 56.77,35.29 56.77,36.31 U5.19 | v59.81,33.51 59.81,32.24 64.89,27.16 64.89,23.1 61.85,20.05 v52.96,20.05
S11  (via drill 0.35)
  Top 0.254: R35.1 60.58,19.8 60.58,21.83 C16.1 60.52,23.08 60.79,23.35 v61.85,23.35 | v66.14,31.66 66.14,31.53 66.54,31.13 66.54,26.02 v63.62,23.1
  Bottom 0.254: v66.14,31.66 65.36,31.66 61.85,35.17 61.85,36.31 U5.15 | v63.62,23.1 62.1,23.1 v61.85,23.35
S12  (via drill 0.35)
  Top 0.254: 46.1,24.12 47.11,24.12 C20.1 | 46.1,24.12 45.08,24.12 R40.1 | v58.04,43.93 57.27,43.93 56.26,44.94 54.73,44.94 v53.97,44.18 | v53.18,31.04 51.5,31.04 49.91,29.45 48.89,29.45 48.44,29.9 46.81,29.9 46.1,29.2 46.1,24.12
  Bottom 0.254: v58.04,43.93 58.94,43.93 59.27,44.26 U5.4 | v53.97,44.18 54.48,43.67 54.48,38.43 54.2,38.15 54.2,32.06 v53.18,31.04
SCL  (via drill 0.35)
  Top 0.254: v17.57,40.98 10.91,34.32 v6.52,34.32
  Bottom 0.254: v6.52,34.32 4.93,34.32 1.49,37.75 1.49,51.02 6.34,55.87 8.1,55.87 8.35,56.12 8.35,57.9 9.57,59.12 9.57,62.01 8.67,62.91 6.36,62.91 5.41,63.86 5.41,65.64 5.8,66.03 10.63,66.03 12.23,64.43 16.67,64.43 19.02,66.79 JP1.2 | v17.57,40.98 26.34,40.98 28.89,38.42 U1.11 28.95,36.38 29.43,36.38 30.07,35.74 R18.2
SCL1  (via drill 0.35)
  Top 0.254: v55.57,40.98 48.91,34.32 v44.52,34.32
  Bottom 0.254: v44.52,34.32 42.93,34.32 39.49,37.75 39.49,51.02 44.34,55.87 46.1,55.87 46.35,56.12 46.35,57.9 47.57,59.12 47.57,62.01 46.67,62.91 44.36,62.91 43.41,63.86 43.41,65.64 43.8,66.03 48.63,66.03 50.23,64.43 54.67,64.43 57.02,66.79 JP10.2 | v55.57,40.98 64.34,40.98 66.89,38.42 U5.11 66.95,36.38 67.43,36.38 68.07,35.74 R25.2
SDA  (via drill 0.35)
  Top 0.254: v29.94,46.98 29.94,48.25 v27.91,50.28
  Top 0.305: JP1.1 29.18,59.58 v29.18,58.41
  Bottom 0.254: 29.94,45.96 28.93,45.96 U1.10 | 29.94,45.96 31.21,45.96 R17.2 | v29.94,46.98 29.94,45.96 | v27.91,50.28 27.91,51.86 29.18,53.13 v29.18,58.41
SDA1  (via drill 0.35)
  Top 0.254: v67.94,46.98 67.94,48.25 v65.91,50.28
  Top 0.305: JP10.1 67.18,59.58 v67.18,58.41
  Bottom 0.254: 67.94,45.96 66.93,45.96 U5.10 | 67.94,45.96 69.21,45.96 R24.2 | v67.94,46.98 67.94,45.96 | v65.91,50.28 65.91,51.86 67.18,53.13 v67.18,58.41
SDF  (via drill 0.35)
  Bottom 0.305: v37,44 37.92,43.08 37.92,40.42 37.92,38.71 36.99,37.78 v36.99,37.68
SET  (via drill 0.35)
  Top 0.254: v24.86,42.66 24.86,39.86 v24.35,39.36 | v23.08,38.09 23.08,36.05 v21.56,34.53
  Bottom 0.254: R19.2 25.37,26.4 23.08,26.4 A1.5 22.83,26.66 21.05,28.43 21.05,34.02 v21.56,34.53 | v24.86,42.66 24.86,45.71 U1.7 | v23.08,38.09 v24.35,39.36
SET1  (via drill 0.35)
  Top 0.254: v62.86,42.66 62.86,39.86 v62.35,39.36 | v61.08,38.09 61.08,36.05 v59.56,34.53
  Bottom 0.254: R36.2 63.37,26.4 61.08,26.4 A2.5 60.83,26.66 59.05,28.43 59.05,34.02 v59.56,34.53 | v62.86,42.66 62.86,45.71 U5.7 | v61.08,38.09 v62.35,39.36
SHDN  (via drill 0.35)
  Top 0.254: v25.62,47.99 24.35,47.99 R20.2 | v7.72,46.04 22.66,46.04 23.83,44.87 v23.83,43.9
  Bottom 0.254: v25.62,47.99 24.86,47.23 24.13,47.23 23.85,46.95 23.85,45.96 U1.6 23.82,43.91 v23.83,43.9 | U2.6 7.58,45.9 v7.72,46.04
SHDN1  (via drill 0.35)
  Top 0.254: v63.62,47.99 62.35,47.99 R46.2 | v45.72,46.04 60.66,46.04 61.83,44.87 v61.83,43.9
  Bottom 0.254: v63.62,47.99 62.86,47.23 62.13,47.23 61.85,46.95 61.85,45.96 U5.6 61.81,43.91 v61.83,43.9 | U6.6 45.58,45.9 v45.72,46.04
TXD0
  Bottom 0.254: U1.9 27.62,47.83 28.22,48.42 29.36,48.42 R16.2
TXD00
  Bottom 0.254: R16.1 31.47,48.25 33.75,45.96 JP5.2
TXD1
  Bottom 0.254: A1.3 17.75,26.66 17.75,31.74 16.73,32.75 16.73,37.58 17.24,38.09 20.72,38.09 21.27,37.53 U1.17
TXD02
  Bottom 0.254: U5.9 65.62,47.83 66.22,48.42 67.36,48.42 R43.2
TXD03
  Bottom 0.254: A2.3 55.75,26.66 55.75,31.74 54.73,32.75 54.73,37.58 55.24,38.09 58.72,38.09 59.27,37.53 U5.17
TXD04
  Bottom 0.254: R43.1 69.47,48.25 71.75,45.96 JP9.2
VADC  (via drill 0.35)
  Top 0.254: R1.1 21.81,48.25 19.78,48.25 R2.1 19.53,48.25 17.5,48.25 C1.1 17.24,47.99 17.01,47.76 v16.05,47.76
  Bottom 0.254: v16.05,47.76 18.04,47.76 18.73,47.06 U1.2
VADC1  (via drill 0.35)
  Top 0.254: R41.1 59.81,48.25 57.78,48.25 R42.1 57.53,48.25 55.5,48.25 C21.1 55.24,47.99 55.01,47.76 v54.05,47.76
  Bottom 0.254: v54.05,47.76 56.04,47.76 56.73,47.06 U5.2
VBAT
  Top 0.762: JP7.1 31.69,56.99 4.33,56.99 JP6.1
  Bottom 0.254: TP4.TP 32.48,66.53
  Bottom 0.762: JP2.1 3.59,61.32 JP6.1 | 32.48,66.53 34.29,64.73 34.29,63 32.63,61.34 JP4.1 32.43,61.3 JP7.1
VBAT1
  Top 0.762: JP14.1 69.69,56.99 42.33,56.99 JP13.1
  Bottom 0.254: TP6.TP 70.48,66.53
  Bottom 0.762: JP12.1 41.59,61.32 JP13.1 | 70.48,66.53 72.29,64.73 72.29,63 70.63,61.34 JP11.1 70.43,61.3 JP14.1
VBAT_O  (via drill 0.35)
  Top 0.254: R1.2 21.88,55.19 | v12.63,55.2 v12.64,55.19
  Top 0.508: JP6.2
  Top 0.762: v12.64,55.19 21.88,55.19 JP7.2 | v12.63,55.2 JP6.2
  Bottom 0.254: D1.A 7.08,60.95 7.08,57.39 D3.A 6.89,57.1 | R22.2 11.4,56.88 U3.2 11.6,55.22 | v12.63,55.2 12.61,55.22
  Bottom 0.508: 6.89,57.1 5.5,57.1 JP6.2
  Bottom 0.762: 12.61,55.22 11.6,55.22
VBAT_O1  (via drill 0.35)
  Top 0.254: R41.2 59.88,55.19 | v50.63,55.2 v50.64,55.19
  Top 0.508: JP13.2
  Top 0.762: v50.64,55.19 59.88,55.19 JP14.2 | v50.63,55.2 JP13.2
  Bottom 0.254: D4.A 45.08,60.95 45.08,57.39 D6.A 44.89,57.1 | R51.2 49.4,56.88 U7.2 49.6,55.22 | v50.63,55.2 50.61,55.22
  Bottom 0.508: 44.89,57.1 43.5,57.1 JP13.2
  Bottom 0.762: 50.61,55.22 49.6,55.22
VCC  (via drill 0.35)
  Top 0.254: v15.72,16.24 15.72,14.97 R12.2 | v13.18,22.85 13.18,21.58 R7.2 | v22.32,15.99 22.32,17.26 R10.2 | 16.73,66.79 JP1.3 | 8.1,11.92 2,18.02 2,34.53 9.11,41.64 9.11,41.89 | 8.1,11.92 15.72,4.3 16.23,4.3 R14.2 | 24.61,37.83 18,44.44 16.99,44.44 16.73,44.18 16.73,43.67 14.96,41.9 v11.4,41.9 v11.4,41.89 | 24.61,37.83 24.86,37.58 24.86,33.26 R3.2 | 24.61,37.83 v29.69,37.83 v29.69,42.66 | 5.05,49.01 v5.12,48.86 | 8.1,11.92 v11.15,14.97
  Top 0.508: v5.12,48.86 5.12,45.77 9,41.89 9.11,41.89 v11.4,41.89
  Top 0.762: v24.35,60.95 22.58,60.95 16.73,66.79 | JP1.3 9.4,59.62 2.5,59.62 1.74,58.86 1.74,52.32 5.05,49.01
  Bottom 0.254: C11.1 10.38,28.94 12.67,28.94 C10.1 12.92,28.94 12.92,26.66 A1.1 12.92,26.4 12.92,22.85 | v15.72,16.24 14.1,17.86 12.92,17.86 12.92,22.85 | 12.92,22.85 v13.18,22.85 | v22.32,15.99 21.31,15.99 20.8,15.48 16.48,15.48 v15.72,16.24 | 25.88,60.69 U4.2 25.62,60.95 | 25.88,59.17 R23.1 | v29.69,37.83 31.21,37.83 R18.1 | v29.69,42.66 29.94,42.66 31.21,43.93 R17.1 | v15.72,16.24 14.09,17.87 12.39,17.87 11.15,16.63 v11.15,14.97
  Bottom 0.508: R38.2 6.07,48.86 v5.12,48.86 | 25.88,59.17 25.88,60.69
  Bottom 0.762: v24.35,60.95 25.62,60.95 | C9.+ 12.55,40.89 12.55,42.29 | 12.55,42.29 12.55,43.17 C19.1 | 11.4,43.26 v11.4,41.89 | 12.55,42.29 14.78,42.29 D2.A | TP3.TP 25.91,59.08 R23.1
  pour Bottom (isolate 0.2, no thermals): 8.96,43.9 8.47,43.9 8.45,43.88 8.45,43.3 8.67,43.08 9.13,43.08 9.65,42.56 11.82,42.56 11.84,42.54 13.17,43.84 9.68,43.84 9.64,43.88 8.98,43.88
VCC1  (via drill 0.35)
  Top 0.254: v53.72,16.24 53.72,14.97 R28.2 | v51.18,22.85 51.18,21.58 R32.2 | v60.32,15.99 60.32,17.26 R34.2 | 54.73,66.79 JP10.3 | 46.1,11.92 40,18.02 40,30.96 40,34.53 47.11,41.64 47.11,41.89 | 46.1,11.92 53.72,4.3 54.23,4.3 R30.2 | 62.61,37.83 56,44.44 54.99,44.44 54.73,44.18 54.73,43.67 52.96,41.9 v49.4,41.9 v49.4,41.89 | 62.61,37.83 62.86,37.58 62.86,33.26 R26.2 | 62.61,37.83 v67.69,37.83 v67.69,42.66 | 43.05,49.01 v43.12,48.86 | 46.1,11.92 v49.15,14.97
  Top 0.305: v37,31 39.96,31 40,30.96
  Top 0.508: v43.12,48.86 43.12,45.77 47,41.89 47.11,41.89 v49.4,41.89
  Top 0.762: v62.35,60.95 60.58,60.95 54.73,66.79 | JP10.3 47.4,59.62 40.5,59.62 39.74,58.86 39.74,52.32 43.05,49.01
  Bottom 0.254: C23.1 48.38,28.94 50.67,28.94 C22.1 50.92,28.94 50.92,26.66 A2.1 50.92,26.4 50.92,22.85 | v53.72,16.24 52.1,17.86 50.92,17.86 50.92,22.85 | 50.92,22.85 v51.18,22.85 | v60.32,15.99 59.31,15.99 58.8,15.48 54.48,15.48 v53.72,16.24 | 63.88,60.69 U8.2 63.62,60.95 | 63.88,59.17 R52.1 | v67.69,37.83 69.21,37.83 R25.1 | v67.69,42.66 67.94,42.66 69.21,43.93 R24.1 | v53.72,16.24 52.09,17.87 50.39,17.87 49.15,16.63 v49.15,14.97
  Bottom 0.508: R48.2 44.07,48.86 v43.12,48.86 | 63.88,59.17 63.88,60.69
  Bottom 0.762: v62.35,60.95 63.62,60.95 | C12.+ 50.55,40.89 50.55,42.29 | 50.55,42.29 50.55,43.17 C26.1 | 49.4,43.26 v49.4,41.89 | 50.55,42.29 52.78,42.29 D5.A | TP10.TP 63.91,59.08 R52.1
  pour Bottom (isolate 0.2, no thermals): 46.96,43.9 46.47,43.9 46.45,43.88 46.45,43.3 46.67,43.08 47.13,43.08 47.65,42.56 49.82,42.56 49.84,42.54 51.17,43.84 47.68,43.84 47.64,43.88 46.98,43.88
VCC_SW
  Bottom 0.254: U4.1 27.66,60.69 27.66,59.17 R23.2 27.66,58.91 27.66,52.63 22.58,47.55 22.58,45.96 U1.5
VCC_SW1
  Bottom 0.254: U8.1 65.66,60.69 65.66,59.17 R52.2 65.66,58.91 65.66,52.63 60.58,47.55 60.58,45.96 U5.5
VDD  (via drill 0.35)
  Top 0.254: v17.5,42.36 16.01,40.88 10.89,40.88 2.65,32.64 2.65,31.48 3.43,30.7 4.31,30.7 5.56,29.45 5.56,27.93 5.05,27.42 3.78,27.42 3.02,26.66 3.02,25.13 3.53,24.62 3.78,24.62 4.29,24.12 R6.2
  Bottom 0.254: 15.4,52.82 TP2.TP | JP5.1 33.75,43.42 32.23,41.9 31.47,41.9 R21.1 31.21,41.9 19.12,41.9 18.66,42.36 v17.5,42.36 | 17.5,45.71 U1.1 17.24,45.96 | 15.21,45.96 D2.C
  Bottom 0.305: v37,39 37,40.39 37,41.84 35.42,43.42 33.75,43.42
  Bottom 0.508: 17.5,45.71 v17.5,42.36 | 15,52.42 15.4,52.82 | 14.99,51.16 15,51.17
  Bottom 0.762: 17.24,45.96 15.21,45.96 | D2.C 15,51.17 15,52.42 | U4.3 26.65,62.91 26.64,62.9 22.71,62.9 16.62,56.81 | 14.99,51.16 13.9,51.16 13.13,51.93 13.13,53.32 16.16,56.35 | 16.62,56.81 16.16,56.35 | TP2.TP 15.29,52.82 16.85,54.38 16.85,55.67 16.16,56.35 | D1.C 8.65,64.78 16.62,56.81
VDD1  (via drill 0.35)
  Top 0.254: v55.5,42.36 54.01,40.88 48.89,40.88 40.65,32.64 40.65,31.48 41.43,30.7 42.31,30.7 43.56,29.45 43.56,27.93 43.05,27.42 41.78,27.42 41.02,26.66 41.02,25.13 41.53,24.62 41.78,24.62 42.29,24.12 R37.2
  Bottom 0.254: 53.4,52.82 TP9.TP | JP9.1 71.75,43.42 70.23,41.9 69.47,41.9 R47.1 69.21,41.9 57.12,41.9 56.66,42.36 v55.5,42.36 | 55.5,45.71 U5.1 55.24,45.96 | 53.21,45.96 D5.C
  Bottom 0.508: 55.5,45.71 v55.5,42.36 | 53,52.42 53.4,52.82 | 52.99,51.16 53,51.17
  Bottom 0.762: 55.24,45.96 53.21,45.96 | D5.C 53,51.17 53,52.42 | U8.3 64.65,62.91 64.64,62.9 60.71,62.9 54.62,56.81 | 52.99,51.16 51.9,51.16 51.13,51.93 51.13,53.32 54.16,56.35 | 54.62,56.81 54.16,56.35 | TP9.TP 53.29,52.82 54.85,54.38 54.85,55.67 54.16,56.35 | D4.C 46.65,64.78 54.62,56.81
VIN
  Bottom 0.254: 7.25,53.16 7.08,53.33 D3.C 6.83,53.33 | 10.32,53.16 U3.3
  Bottom 0.508: C17.1 4.5,43.28
  Bottom 0.762: 7.25,53.16 10.32,53.16
  Bottom 1.016: C17.1 4.29,43.28 2.5,45.07 2.5,50.35 5.48,53.33 6.83,53.33
  pour Bottom (isolate 0.2, no thermals): 7.17,43.91 5.96,43.91 5.77,44.1 4.12,44.1 3.96,43.94 3.96,42.73 4.15,42.54 5.63,42.54 6.23,43.14 7.02,43.14 7.17,43.29
VIN1
  Bottom 0.254: 45.25,53.16 45.08,53.33 D6.C 44.83,53.33 | 48.32,53.16 U7.3
  Bottom 0.508: C24.1 42.5,43.28
  Bottom 0.762: 45.25,53.16 48.32,53.16
  Bottom 1.016: C24.1 42.29,43.28 40.5,45.07 40.5,50.35 43.48,53.33 44.83,53.33
  pour Bottom (isolate 0.2, no thermals): 45.17,43.91 43.96,43.91 43.77,44.1 42.12,44.1 41.96,43.94 41.96,42.73 42.15,42.54 43.63,42.54 44.23,43.14 45.02,43.14 45.17,43.29

## Text on the board
tPlace: DADABHAGWAN.ORG | DADABHAGWAN.ORG
bPlace: VCC | SCL | SDA | VCC | SCL | SDA | K | K | - | - | - | - | + | + | + | + | _/ _ | _/ _ | _/ _ | _/ _ | K | K | 1 | 1 | K | K | + | + | DADABHAGWAN.ORG | DADABHAGWAN.ORG
_tNames: JP1 | JP1 | R20 | R20 | C1 | R2 | R1 | C1 | R2 | R1 | R45 | R45 | JP3 | JP3 | R3 | R3 | S1 | S2 | R4 | S1 | S2 | R4 | C2 | C2 | R6 | R5 | C3 | R6 | R5 | C3 | R7 | C4 | R7 | C4 | R9 | R9 | S3 | S4 | S5 | S3 | S4 | S5 | C5 | R8 | C5 | R8 | R10 | R10 | R11 | R12 | R11 | R12 | C6 | C6 | S6 | S6 | R14 | R13 | C7 | R14 | R13 | C7
_bNames: TP1 | TP1 | D1 | TP4 | D1 | TP4 | U4 | U4 | JP2 | JP2 | JP4 | JP4 | TP3 | TP3 | D3 | R23 | D3 | R23 | JP7 | JP7 | JP6 | R22 | JP6 | R22 | TP2 | TP2 | TP5 | TP5 | U3 | U3 | R15 | R15 | R38 | R39 | D2 | U1 | R38 | R39 | D2 | U1 | R16 | R16 | JP5 | JP5 | U2 | U2 | C17 | C17 | C19 | C19 | L1 | L1 | C18 | C18 | C9 | C9 | C10 | R17 | C10 | R17 | R21 | R21 | C11 | R19 | R18 | C11 | R19 | R18 | A1 | A1